# Altium PCB main_ADC_PCB.PcbDoc (part 7 of 8)
Units mm, origin at the board's own origin, x right, y up, seen from the top; angles counter-clockwise.
Board outline 150 x 100 mm, 4 copper layers (Top Layer, Layer 1, Layer 2, Bottom Layer), stack 1.62 mm thick; 535 components, 354 nets, 1725 pads, 1075 vias.
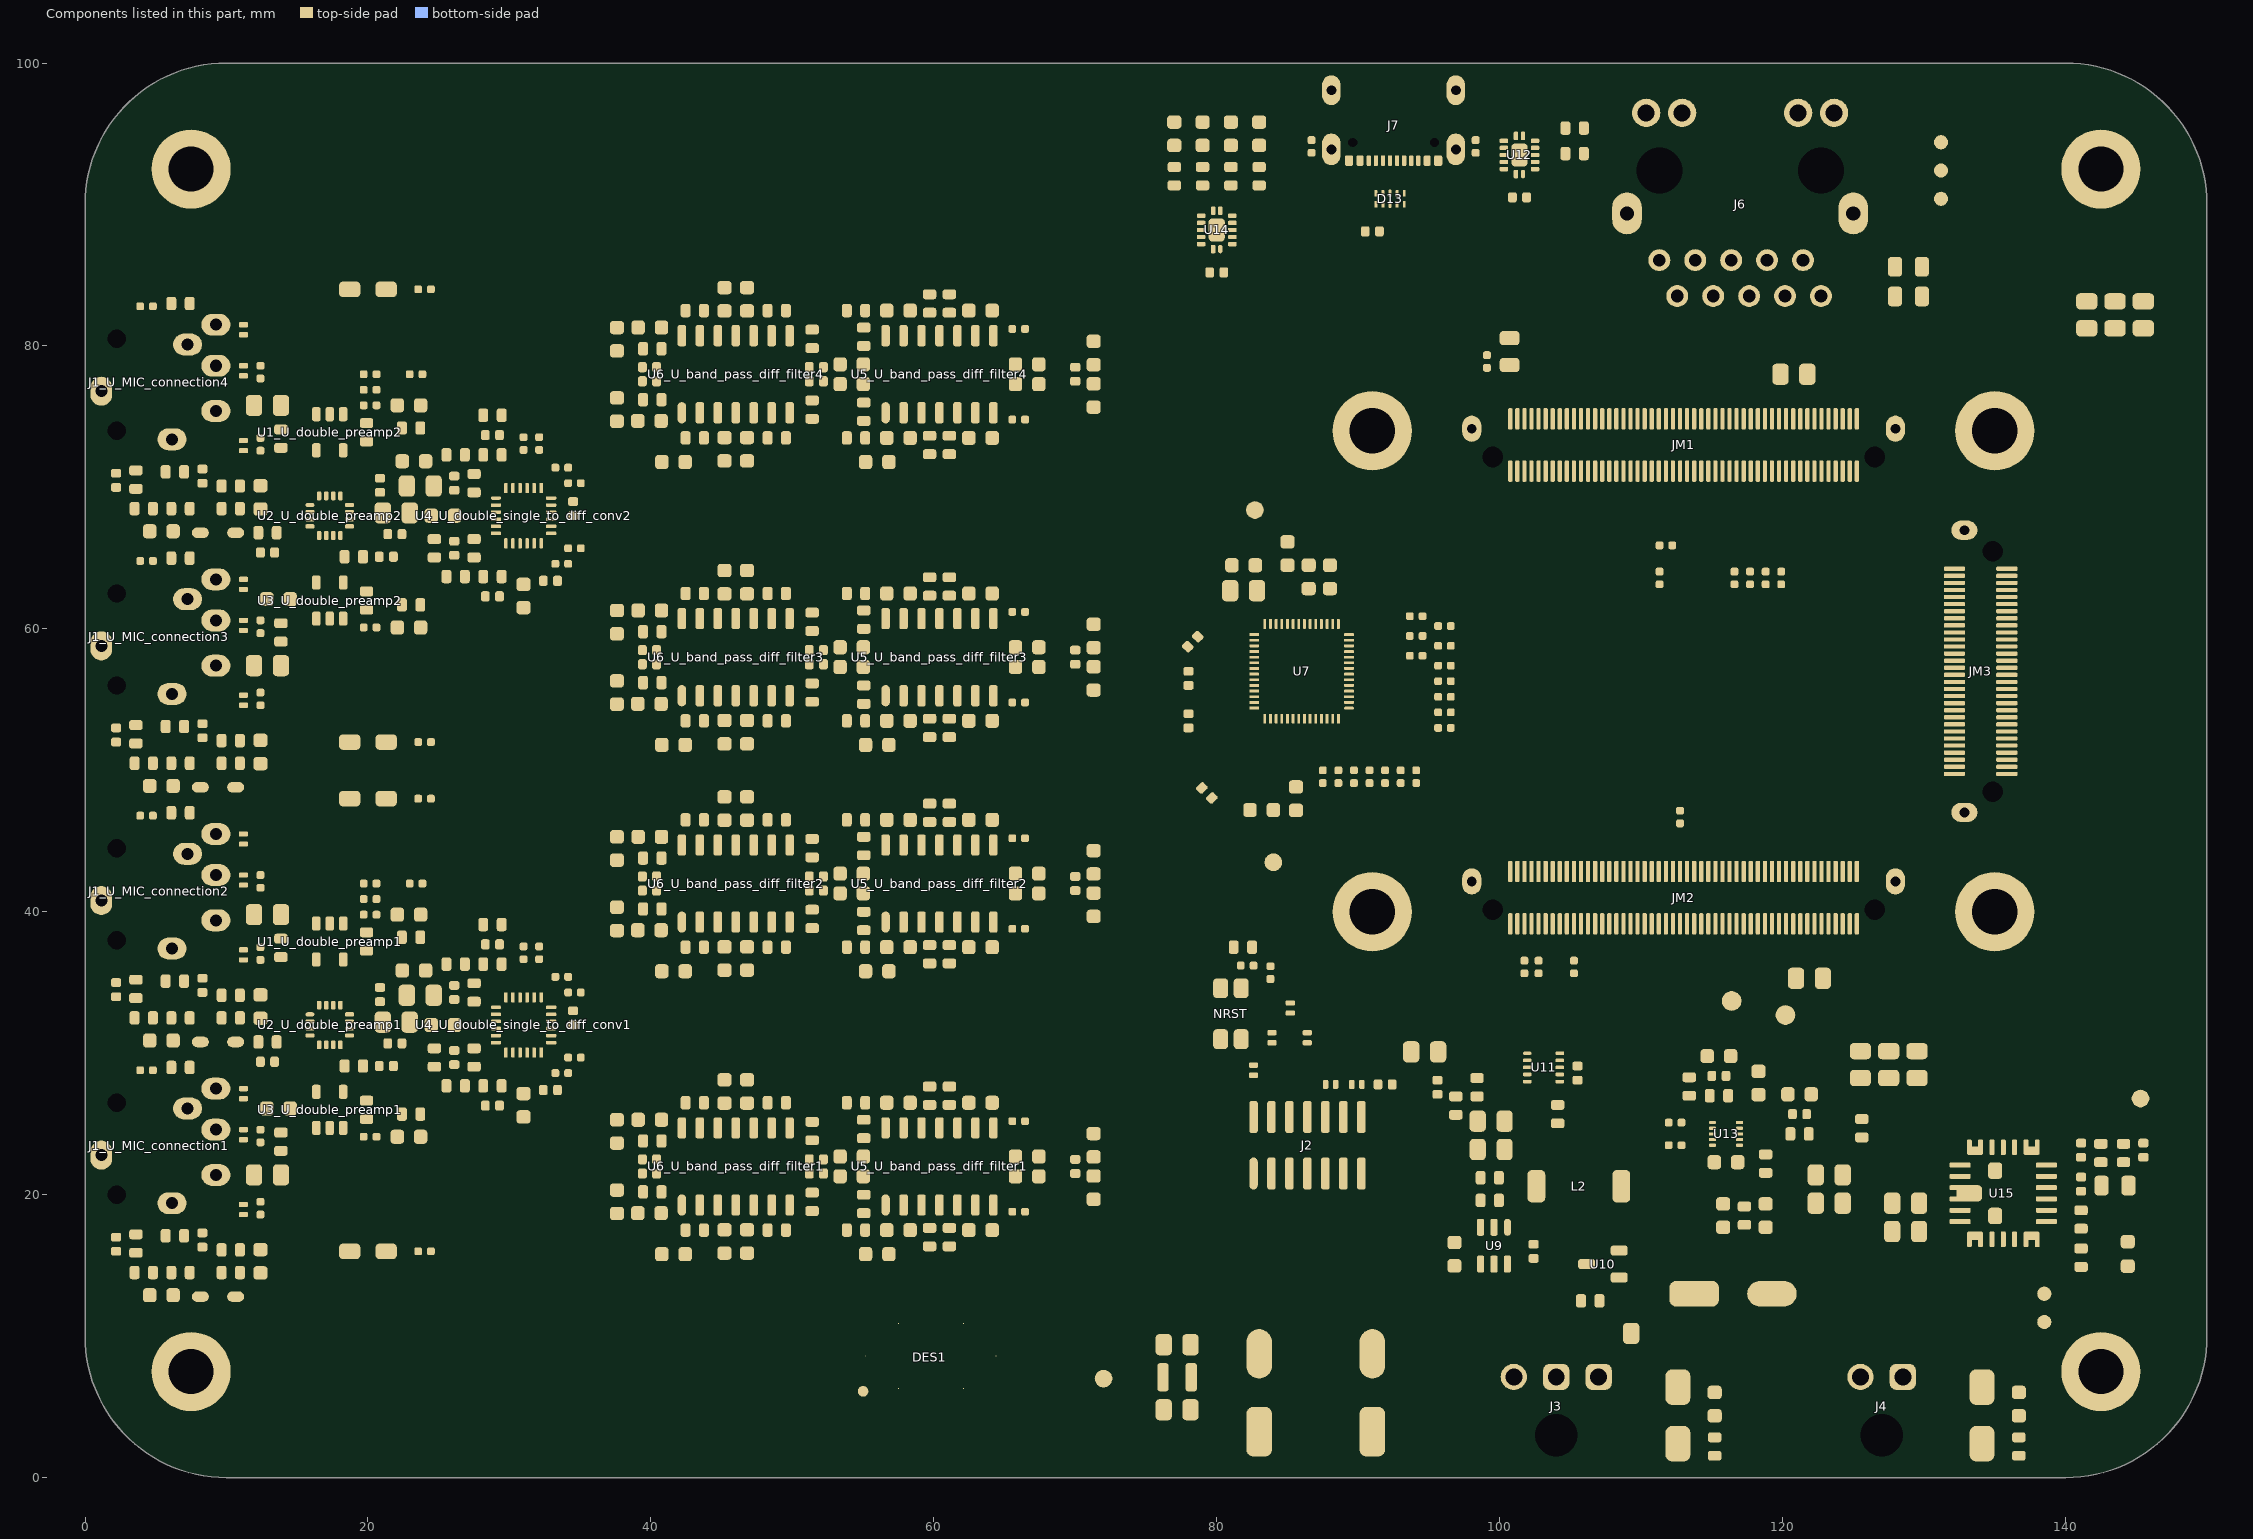
[diagram p9: the components of this part, seen from the top]

## Polygon pours and split planes (outlines as drawn) (continued)
USB_VBUS on Top Layer "USB_VBUS_L01_P008" (solid, pour order 8): 91.3,91.1 91.7,91.1 cw(c91.7,90.9) 91.9,90.9 91.9,87.8 cw(c91.7,87.8) 91.7,87.6 91.3,87.6 cw(c91.3,87.8) 91.1,87.8 91.1,90.9 cw(c91.3,90.9)
VOCM on Top Layer "VOCM_L01_P319" (solid, pour order 319): 27.3,60.5 27.3,60.3 ccw(c27.6,60.3) 27.6,60 29,60 ccw(c29,60.3) 29.3,60.3 29.3,60.5 ccw(c29,60.5) 29,60.8 27.6,60.8 ccw(c27.6,60.5)
VOCM on Top Layer "VOCM_L01_P391" (solid, pour order 391): 34.4,68.6 34.4,69.4 35,69.4 35.5,69.4 cw(c35.5,69.1) 35.8,69.1 35.8,66.9 cw(c35.5,66.9) 35.5,66.6 35.3,66.6 cw(c35.3,66.9) 35,66.9 35,68.2 ccw(c34.6,68.2) 34.6,68.6
VOCM on Top Layer "VOCM_L01_P131" (solid, pour order 131): 34,32.8 34,33.2 cw(c34.2,33.2) 34.2,33.4 35.6,33.4 cw(c35.6,33.2) 35.8,33.2 35.8,32.8 cw(c35.6,32.8) 35.6,32.6 34.2,32.6 cw(c34.2,32.8)
VOCM on Top Layer "VOCM_L01_P341" (solid, pour order 341): 34.4,32.6 34.4,33.4 35,33.4 35.5,33.4 cw(c35.5,33.1) 35.8,33.1 35.8,30.9 cw(c35.5,30.9) 35.5,30.6 35.3,30.6 cw(c35.3,30.9) 35,30.9 35,32.2 ccw(c34.6,32.2) 34.6,32.6
VOCM on Top Layer "VOCM_L01_P132" (solid, pour order 132): 34,68.8 34,69.2 cw(c34.2,69.2) 34.2,69.4 35.6,69.4 cw(c35.6,69.2) 35.8,69.2 35.8,68.8 cw(c35.6,68.8) 35.6,68.6 34.2,68.6 cw(c34.2,68.8)
VOCM on Top Layer "VOCM_L01_P392" (solid, pour order 392): 35.3,33.4 39.6,33.4 cw(c39.6,33.1) 39.9,33.1 39.9,30.9 cw(c39.6,30.9) 39.6,30.6 35.3,30.6 cw(c35.3,30.9) 35,30.9 35,33.1 cw(c35.3,33.1)
VOCM on Top Layer "VOCM_L01_P393" (solid, pour order 393): 35.3,69.4 39.6,69.4 cw(c39.6,69.1) 39.9,69.1 39.9,66.9 cw(c39.6,66.9) 39.6,66.6 35.3,66.6 cw(c35.3,66.9) 35,66.9 35,69.1 cw(c35.3,69.1)
5VA on Top Layer "5VA_L01_P286" (solid, pour order 286): 41.725,15.5 41.725,16.1 cw(c42.125,16.1) 42.125,16.5 43.525,16.5 cw(c43.525,16.1) 43.925,16.1 43.925,15.5 cw(c43.525,15.5) 43.525,15.1 42.125,15.1 cw(c42.125,15.5)
5VA on Top Layer "5VA_L01_P284" (solid, pour order 284): 56.125,15.5 56.125,16.1 cw(c56.525,16.1) 56.525,16.5 57.925,16.5 cw(c57.925,16.1) 58.325,16.1 58.325,15.5 cw(c57.925,15.5) 57.925,15.1 56.525,15.1 cw(c56.525,15.5)
GND on Top Layer "GND_L01_P079" (solid, pour order 79): 49.9,22.9 51.3,22.9 cw(c51.3,22.688) 51.512,22.688 51.512,21.312 cw(c51.3,21.312) 51.3,21.1 49.9,21.1 cw(c49.9,21.4) 49.6,21.4 49.6,22.6 cw(c49.9,22.6)
GND on Top Layer "GND_L01_P069" (solid, pour order 69): 40.089,22.689 40.089,21.311 ccw(c40.3,21.311) 40.3,21.1 41.4,21.1 ccw(c41.4,21.3) 41.6,21.3 41.6,22.7 ccw(c41.4,22.7) 41.4,22.9 40.3,22.9 ccw(c40.3,22.689)
VOCM on Top Layer "VOCM_L01_P049" (solid, pour order 49): 38,22 38,21.4 ccw(c38.3,21.4) 38.3,21.1 38.4,21.1 cw(c38.4,20.8) 38.7,20.8 38.7,19.8 ccw(c39,19.8) 39,19.5 39.6,19.5 ccw(c39.6,19.8) 39.9,19.8 39.9,22
VOCM on Top Layer "VOCM_L01_P048" (solid, pour order 48): 38,22 38,22.6 cw(c38.3,22.6) 38.3,22.9 38.4,22.9 ccw(c38.4,23.2) 38.7,23.2 38.7,24.2 cw(c39,24.2) 39,24.5 39.6,24.5 cw(c39.6,24.2) 39.9,24.2 39.9,22
VOCM on Top Layer "VOCM_L01_P041" (solid, pour order 41): 66.8,22 66.8,20.8 cw(c66.5,20.8) 66.5,20.5 66.1,20.5 ccw(c66.1,20.2) 65.8,20.2 65.8,19.8 ccw(c66.1,19.8) 66.1,19.5 67.8,19.5 ccw(c67.8,19.8) 68.1,19.8 68.1,22
VOCM on Top Layer "VOCM_L01_P040" (solid, pour order 40): 66.8,22 66.8,23.2 ccw(c66.5,23.2) 66.5,23.5 66.1,23.5 cw(c66.1,23.8) 65.8,23.8 65.8,24.2 cw(c66.1,24.2) 66.1,24.5 67.8,24.5 cw(c67.8,24.2) 68.1,24.2 68.1,22
VOCM on Top Layer "VOCM_L01_P033" (solid, pour order 33): 51.2,18.3 53.6,18.3 ccw(c53.6,18.7) 54,18.7 54,22 51.8,22 51.8,21.1 ccw(c52,21.1) 52,20.9 cw(c52,20.8) 52.1,20.8 52.1,19.6 cw(c51.9,19.6) 51.9,19.4 51.1,19.4 ccw(c51.1,19.1) 50.8,19.1 50.8,18.7 ccw(c51.2,18.7)
VOCM on Top Layer "VOCM_L01_P032" (solid, pour order 32): 51.2,25.7 53.6,25.7 cw(c53.6,25.3) 54,25.3 54,22 51.8,22 51.8,22.9 cw(c52,22.9) 52,23.1 ccw(c52,23.2) 52.1,23.2 52.1,24.4 ccw(c51.9,24.4) 51.9,24.6 51.1,24.6 cw(c51.1,24.9) 50.8,24.9 50.8,25.3 cw(c51.2,25.3)
GND on Top Layer "GND_L01_P021" (solid, pour order 21): 60.6,22.2 60.2,22.2 cw(c60.2,22.5) 59.9,22.5 59.9,25.3 cw(c60.2,25.3) 60.2,25.6 60.6,25.6 cw(c60.6,25.3) 60.9,25.3 60.9,22.5 cw(c60.6,22.5)
5VA on Top Layer "5VA_L01_P020" (solid, pour order 20): 60.2,21.8 60.6,21.8 cw(c60.6,21.5) 60.9,21.5 60.9,18.7 cw(c60.6,18.7) 60.6,18.4 60.2,18.4 cw(c60.2,18.7) 59.9,18.7 59.9,21.5 cw(c60.2,21.5)
GND on Top Layer "GND_L01_P019" (solid, pour order 19): 46.2,22.2 45.8,22.2 cw(c45.8,22.5) 45.5,22.5 45.5,25.3 cw(c45.8,25.3) 45.8,25.6 46.2,25.6 cw(c46.2,25.3) 46.5,25.3 46.5,22.5 cw(c46.2,22.5)
5VA on Top Layer "5VA_L01_P018" (solid, pour order 18): 45.8,21.8 46.2,21.8 cw(c46.2,21.5) 46.5,21.5 46.5,18.7 cw(c46.2,18.7) 46.2,18.4 45.8,18.4 cw(c45.8,18.7) 45.5,18.7 45.5,21.5 cw(c45.8,21.5)
3.3VPWR on Top Layer "3.3VPWR_L01_P162" (solid, pour order 162): 22 vertices, not listed, extent 122,28.5 140,40.5
3.3VD on Top Layer "3.3VD_L01_P394" (solid, pour order 394): 32.9,55.5 34.5,55.5 cw(c34.5,55.1) 34.9,55.1 34.9,44.9 cw(c34.5,44.9) 34.5,44.5 32.9,44.5 cw(c32.9,44.9) 32.5,44.9 32.5,55.1 cw(c32.9,55.1)
5VA on Top Layer "5VA_L01_P318" (solid, pour order 318): 56.125,71.5 56.125,72.1 cw(c56.525,72.1) 56.525,72.5 57.925,72.5 cw(c57.925,72.1) 58.325,72.1 58.325,71.5 cw(c57.925,71.5) 57.925,71.1 56.525,71.1 cw(c56.525,71.5)
5VA on Top Layer "5VA_L01_P312" (solid, pour order 312): 41.725,71.5 41.725,72.1 cw(c42.125,72.1) 42.125,72.5 43.525,72.5 cw(c43.525,72.1) 43.925,72.1 43.925,71.5 cw(c43.525,71.5) 43.525,71.1 42.125,71.1 cw(c42.125,71.5)
5VA on Top Layer "5VA_L01_P311" (solid, pour order 311): 56.125,51.5 56.125,52.1 cw(c56.525,52.1) 56.525,52.5 57.925,52.5 cw(c57.925,52.1) 58.325,52.1 58.325,51.5 cw(c57.925,51.5) 57.925,51.1 56.525,51.1 cw(c56.525,51.5)
5VA on Top Layer "5VA_L01_P304" (solid, pour order 304): 41.725,51.5 41.725,52.1 cw(c42.125,52.1) 42.125,52.5 43.525,52.5 cw(c43.525,52.1) 43.925,52.1 43.925,51.5 cw(c43.525,51.5) 43.525,51.1 42.125,51.1 cw(c42.125,51.5)
5VA on Top Layer "5VA_L01_P290" (solid, pour order 290): 56.125,35.5 56.125,36.1 cw(c56.525,36.1) 56.525,36.5 57.925,36.5 cw(c57.925,36.1) 58.325,36.1 58.325,35.5 cw(c57.925,35.5) 57.925,35.1 56.525,35.1 cw(c56.525,35.5)
5VA on Top Layer "5VA_L01_P288" (solid, pour order 288): 41.5,35.5 41.5,36.1 cw(c41.9,36.1) 41.9,36.5 43.3,36.5 cw(c43.3,36.1) 43.7,36.1 43.7,35.5 cw(c43.3,35.5) 43.3,35.1 41.9,35.1 cw(c41.9,35.5)
VOCM on Top Layer "VOCM_L01_P282" (solid, pour order 282): 13.5,60.9 15,60.9 cw(c15,60.6) 15.3,60.6 15.3,60.2 cw(c15,60.2) 15,59.9 13.5,59.9 cw(c13.5,60.2) 13.2,60.2 13.2,60.6 cw(c13.5,60.6)
VOCM on Top Layer "VOCM_L01_P280" (solid, pour order 280): 13.5,24.9 15,24.9 cw(c15,24.6) 15.3,24.6 15.3,24.2 cw(c15,24.2) 15,23.9 13.5,23.9 cw(c13.5,24.2) 13.2,24.2 13.2,24.6 cw(c13.5,24.6)
VOCM on Top Layer "VOCM_L01_P115" (solid, pour order 115): 19.5,29.7 20.9,29.7 cw(c20.9,29.4) 21.2,29.4 21.2,27.9 cw(c20.9,27.9) 20.9,27.6 19.5,27.6 cw(c19.5,27.9) 19.2,27.9 19.2,29.4 cw(c19.5,29.4)
VOCM on Top Layer "VOCM_L01_P114" (solid, pour order 114): 19.5,65.7 20.9,65.7 cw(c20.9,65.4) 21.2,65.4 21.2,63.9 cw(c20.9,63.9) 20.9,63.6 19.5,63.6 cw(c19.5,63.9) 19.2,63.9 19.2,65.4 cw(c19.5,65.4)
3.3VD on Top Layer "3.3VD_L01_P278" (solid, pour order 278): 81.3,36.848 79.352,36.848 cw(c79.352,37.2) 79,37.2 79,37.8 cw(c79.348,37.8) 79.348,38.148 81.3,38.148 cw(c81.3,37.748) 81.7,37.748 81.7,37.248 cw(c81.3,37.248)
3.3VD on Top Layer "3.3VD_L01_P276" (solid, pour order 276): 124.3,41.9 125.8,41.9 ccw(c125.8,42.1) 126,42.1 126,46.2 ccw(c125.8,46.2) 125.8,46.4 124.3,46.4 ccw(c124.3,46.2) 124.1,46.2 124.1,42.1 ccw(c124.3,42.1)
NetJM2_9 on Top Layer "NETJM2_9_L01_P176" (solid, pour order 176): 122.8,40.916 123.2,40.916 cw(c123.2,40.716) 123.4,40.716 123.4,38.316 cw(c123.2,38.316) 123.2,38.116 122.8,38.116 cw(c122.8,38.316) 122.6,38.316 122.6,40.716 cw(c122.8,40.716)
3.3VD on Top Layer "3.3VD_L01_P166" (solid, pour order 166): 110.8,63 110.8,63.2 cw(c111.1,63.2) 111.1,63.5 123,63.5 cw(c123,63.2) 123.3,63.2 123.3,63 cw(c123,63) 123,62.7 111.1,62.7 cw(c111.1,63)
3.3VD on Top Layer "3.3VD_L01_P165" (solid, pour order 165): 123.4,75.5 123.4,72.5 cw(c123.1,72.5) 123.1,72.2 120.6,72.2 cw(c120.6,72.5) 120.3,72.5 120.3,73.5 cw(c120.6,73.5) 120.6,73.8 122.3,73.8 ccw(c122.3,74.1) 122.6,74.1 122.6,75.5 cw(c122.8,75.5) 122.8,75.7 123.2,75.7 cw(c123.2,75.5)
3.3VPWR on Top Layer "3.3VPWR_L01_P163" (solid, pour order 163): 46 vertices, not listed, extent 121,34.4 146.5,82
3.3VPWR on Top Layer "3.3VPWR_L01_P161" (solid, pour order 161): 25 vertices, not listed, extent 130.6,22.7 146.5,35.2
NetC87_1 on Top Layer "NETC87_1_L01_P160" (solid, pour order 160): 146.5,22.7 146.5,22.1 cw(c146.2,22.1) 146.2,21.8 138,21.8 cw(c138,22) 137.8,22 137.8,22.2 cw(c138,22.2) 138,22.4 140.1,22.4 ccw(c140.1,22.7) 140.4,22.7 cw(c140.7,22.7) 140.7,23 146.2,23 cw(c146.2,22.7)
12VIN on Top Layer "12VIN_L01_P155" (solid, pour order 155): 17 vertices, not listed, extent 105.7,5.2 116.2,11.4
5VA on Top Layer "5VA_L01_P153" (solid, pour order 153): 102.3,30.9 102.3,29.5 cw(c102.1,29.5) 102.1,29.3 101.4,29.3 ccw(c101.4,28.576) 100.888,29.088 100.8,29 99.712,27.912 cw(c99.2,28.424) 99.2,27.7 95.2,27.7 cw(c95.2,28) 94.9,28 94.9,30.9 cw(c95.2,30.9) 95.2,31.2 102,31.2 cw(c102,30.9)
GND on Top Layer "GND_L01_P009" (solid, pour order 9): 105.3,28.5 105.7,28.5 cw(c105.7,28.2) 106,28.2 106,27.3 cw(c105.7,27.3) 105.7,27 105.3,27 cw(c105.3,27.3) 105,27.3 105,28.2 cw(c105.3,28.2)
PRE_REG_OUT on Top Layer "PRE_REG_OUT_L01_P150" (solid, pour order 150): 20 vertices, not listed, extent 99.5,20.6 107.3,25.5
NetC57_2 on Top Layer "NETC57_2_L01_P149" (solid, pour order 149): 17 vertices, not listed, extent 100.2,14.3 107.3,19.7
NetR83_2 on Top Layer "NETR83_2_L01_P140" (solid, pour order 140): 105.5,15.3 105.5,14.9 ccw(c105.8,14.9) 105.8,14.6 106.3,14.6 cw(c106.3,14.3) 106.6,14.3 106.6,12.2 ccw(c106.9,12.2) 106.9,11.9 107.3,11.9 ccw(c107.3,12.2) 107.6,12.2 107.6,15.3 ccw(c107.3,15.3) 107.3,15.6 105.8,15.6 ccw(c105.8,15.3)
12V_IN on Top Layer "12V_IN_L01_P139" (solid, pour order 139): 33 vertices, not listed, extent 77.312,6 108.2,15.8
12V_MIC on Top Layer "12V_MIC_L01_P137" (solid, pour order 137): 71,6.1 71,7.9 cw(c71.3,7.9) 71.3,8.2 73.7,8.2 76.6,8.2 cw(c76.6,7.8) 77,7.8 77,4.1 cw(c76.7,4.1) 76.7,3.8 74,3.8 cw(c74,4.1) 73.7,4.1 73.7,5.5 ccw(c73.4,5.5) 73.4,5.8 71.3,5.8 cw(c71.3,6.1)
3.3VD on Top Layer "3.3VD_L01_P136" (solid, pour order 136): 100,80.25 100,80.85 cw(c100.4,80.85) 100.4,81.25 102.05,81.25 cw(c102.05,80.8) 102.5,80.8 102.5,80.3 cw(c102.05,80.3) 102.05,79.85 100.4,79.85 cw(c100.4,80.25)
3.3VD on Top Layer "3.3VD_L01_P134" (solid, pour order 134): 33.5,73.7 33.5,73.4 cw(c33.2,73.4) 33.2,73.1 30.8,73.1 cw(c30.8,73.4) 30.5,73.4 30.5,73.7 cw(c30.8,73.7) 30.8,74 33.2,74 cw(c33.2,73.7)
VOCM on Top Layer "VOCM_L01_P129" (solid, pour order 129): 32.2,27.9 32.6,27.9 cw(c32.6,27.7) 32.8,27.7 32.8,26.3 cw(c32.6,26.3) 32.6,26.1 32.2,26.1 cw(c32.2,26.3) 32,26.3 32,27.7 cw(c32.2,27.7)
VOCM on Top Layer "VOCM_L01_P127" (solid, pour order 127): 32.2,63.9 32.6,63.9 cw(c32.6,63.7) 32.8,63.7 32.8,62.3 cw(c32.6,62.3) 32.6,62.1 32.2,62.1 cw(c32.2,62.3) 32,62.3 32,63.7 cw(c32.2,63.7)
5VA on Top Layer "5VA_L01_P126" (solid, pour order 126): 18.1,73.2 18.4,73.2 cw(c18.4,72.9) 18.7,72.9 18.7,72.76 ccw(c18.96,72.76) 18.96,72.5 22.8,72.5 cw(c22.8,72.2) 23.1,72.2 23.1,71.5 cw(c22.8,71.5) 22.8,71.2 18.1,71.2 cw(c18.1,71.5) 17.8,71.5 17.8,72.9 cw(c18.1,72.9)
5VA on Top Layer "5VA_L01_P125" (solid, pour order 125): 18.1,37.2 18.4,37.2 cw(c18.4,36.9) 18.7,36.9 18.7,36.76 ccw(c18.96,36.76) 18.96,36.5 22.8,36.5 cw(c22.8,36.2) 23.1,36.2 23.1,35.5 cw(c22.8,35.5) 22.8,35.2 18.1,35.2 cw(c18.1,35.5) 17.8,35.5 17.8,36.9 cw(c18.1,36.9)
3.3VD on Top Layer "3.3VD_L01_P123" (solid, pour order 123): 20.6,69.3 23.2,69.3 ccw(c23.2,69.6) 23.5,69.6 23.5,70.6 ccw(c23.2,70.6) 23.2,70.9 21.7,70.9 ccw(c21.7,70.6) 21.4,70.6 21.4,70.3 cw(c21.1,70.3) 21.1,70 20.6,70 ccw(c20.6,69.8) 20.4,69.8 20.4,69.5 ccw(c20.6,69.5)
3.3VD on Top Layer "3.3VD_L01_P122" (solid, pour order 122): 20.6,33.3 23.2,33.3 ccw(c23.2,33.6) 23.5,33.6 23.5,34.6 ccw(c23.2,34.6) 23.2,34.9 21.7,34.9 ccw(c21.7,34.6) 21.4,34.6 21.4,34.3 cw(c21.1,34.3) 21.1,34 20.6,34 ccw(c20.6,33.8) 20.4,33.8 20.4,33.5 ccw(c20.6,33.5)
5VA on Top Layer "5VA_L01_P118" (solid, pour order 118): 14.1,61.4 14.9,61.4 ccw(c14.9,61.7) 15.2,61.7 15.2,62.3 cw(c15.5,62.3) 15.5,62.6 16.5,62.6 ccw(c16.5,62.9) 16.8,62.9 16.8,63.6 ccw(c16.5,63.6) 16.5,63.9 14.1,63.9 ccw(c14.1,63.6) 13.8,63.6 13.8,61.7 ccw(c14.1,61.7)
5VA on Top Layer "5VA_L01_P117" (solid, pour order 117): 14.1,25.4 14.9,25.4 ccw(c14.9,25.7) 15.2,25.7 15.2,26.3 cw(c15.5,26.3) 15.5,26.6 16.5,26.6 ccw(c16.5,26.9) 16.8,26.9 16.8,27.6 ccw(c16.5,27.6) 16.5,27.9 14.1,27.9 ccw(c14.1,27.6) 13.8,27.6 13.8,25.7 ccw(c14.1,25.7)
VOCM on Top Layer "VOCM_L01_P113" (solid, pour order 113): 11.9,31.4 12.5,31.4 cw(c12.5,31.1) 12.8,31.1 12.8,28.3 cw(c12.5,28.3) 12.5,28 11.9,28 cw(c11.9,28.3) 11.6,28.3 11.6,31.1 cw(c11.9,31.1)
VOCM on Top Layer "VOCM_L01_P106" (solid, pour order 106): 11.9,67.4 12.5,67.4 cw(c12.5,67.1) 12.8,67.1 12.8,64.3 cw(c12.5,64.3) 12.5,64 11.9,64 cw(c11.9,64.3) 11.6,64.3 11.6,67.1 cw(c11.9,67.1)
VOCM on Top Layer "VOCM_L01_P105" (solid, pour order 105): 22.5,61.048 21.3,61.048 cw(c21.3,61.448) 20.9,61.448 20.9,61.948 cw(c21.3,61.948) 21.3,62.348 22.5,62.348 cw(c22.5,61.948) 22.9,61.948 22.9,61.448 cw(c22.5,61.448)
VOCM on Top Layer "VOCM_L01_P104" (solid, pour order 104): 22.5,25.048 21.3,25.048 cw(c21.3,25.448) 20.9,25.448 20.9,25.948 cw(c21.3,25.948) 21.3,26.348 22.5,26.348 cw(c22.5,25.948) 22.9,25.948 22.9,25.448 cw(c22.5,25.448)
VOCM on Top Layer "VOCM_L01_P103" (solid, pour order 103): 29.35,39.752 30.55,39.752 cw(c30.55,39.352) 30.95,39.352 30.95,38.852 cw(c30.55,38.852) 30.55,38.452 29.35,38.452 cw(c29.35,38.852) 28.95,38.852 28.95,39.352 cw(c29.35,39.352)
VOCM on Top Layer "VOCM_L01_P102" (solid, pour order 102): 29.35,75.752 30.55,75.752 cw(c30.55,75.352) 30.95,75.352 30.95,74.852 cw(c30.55,74.852) 30.55,74.452 29.35,74.452 cw(c29.35,74.852) 28.95,74.852 28.95,75.352 cw(c29.35,75.352)
VOCM on Top Layer "VOCM_L01_P101" (solid, pour order 101): 22.5,73.548 21.3,73.548 cw(c21.3,73.948) 20.9,73.948 20.9,74.448 cw(c21.3,74.448) 21.3,74.848 22.5,74.848 cw(c22.5,74.448) 22.9,74.448 22.9,73.948 cw(c22.5,73.948)
VOCM on Top Layer "VOCM_L01_P100" (solid, pour order 100): 22.5,37.548 21.3,37.548 cw(c21.3,37.948) 20.9,37.948 20.9,38.448 cw(c21.3,38.448) 21.3,38.848 22.5,38.848 cw(c22.5,38.448) 22.9,38.448 22.9,37.948 cw(c22.5,37.948)
VOCM on Top Layer "VOCM_L01_P099" (solid, pour order 99): 14.5,36.9 14.5,35.7 cw(c14.1,35.7) 14.1,35.3 13.6,35.3 cw(c13.6,35.7) 13.2,35.7 13.2,36.9 cw(c13.6,36.9) 13.6,37.3 14.1,37.3 cw(c14.1,36.9)
VOCM on Top Layer "VOCM_L01_P098" (solid, pour order 98): 14.5,72.9 14.5,71.7 cw(c14.1,71.7) 14.1,71.3 13.6,71.3 cw(c13.6,71.7) 13.2,71.7 13.2,72.9 cw(c13.6,72.9) 13.6,73.3 14.1,73.3 cw(c14.1,72.9)
12V_MIC on Top Layer "12V_MIC_L01_P091" (solid, pour order 91): 17 vertices, not listed, extent 7.4,11.1 10.1,13.4
12V_MIC on Top Layer "12V_MIC_L01_P090" (solid, pour order 90): 17 vertices, not listed, extent 7.4,29.1 10.1,31.4
12V_MIC on Top Layer "12V_MIC_L01_P089" (solid, pour order 89): 17 vertices, not listed, extent 7.4,47.1 10.1,49.4
12V_MIC on Top Layer "12V_MIC_L01_P085" (solid, pour order 85): 2.3,29.3 3.9,29.3 cw(c3.9,29) 4.2,29 4.2,28.6 cw(c3.9,28.6) 3.9,28.3 2.3,28.3 cw(c2.3,28.6) 2,28.6 2,29 cw(c2.3,29)
12V_MIC on Top Layer "12V_MIC_L01_P084" (solid, pour order 84): 2.3,47.3 3.9,47.3 cw(c3.9,47) 4.2,47 4.2,46.6 cw(c3.9,46.6) 3.9,46.3 2.3,46.3 cw(c2.3,46.6) 2,46.6 2,47 cw(c2.3,47)
12V_MIC on Top Layer "12V_MIC_L01_P083" (solid, pour order 83): 2.3,65.3 3.9,65.3 cw(c3.9,65) 4.2,65 4.2,64.6 cw(c3.9,64.6) 3.9,64.3 2.3,64.3 cw(c2.3,64.6) 2,64.6 2,65 cw(c2.3,65)
12V_MIC on Top Layer "12V_MIC_L01_P082" (solid, pour order 82): 2.3,83.3 3.9,83.3 cw(c3.9,83) 4.2,83 4.2,82.6 cw(c3.9,82.6) 3.9,82.3 2.3,82.3 cw(c2.3,82.6) 2,82.6 2,83 cw(c2.3,83)
12V_MIC on Top Layer "12V_MIC_L01_P080" (solid, pour order 80): 17 vertices, not listed, extent 7.4,65.1 10.1,67.4
GND on Top Layer "GND_L01_P078" (solid, pour order 78): 49.9,42.9 51.3,42.9 cw(c51.3,42.688) 51.512,42.688 51.512,41.312 cw(c51.3,41.312) 51.3,41.1 49.9,41.1 cw(c49.9,41.4) 49.6,41.4 49.6,42.6 cw(c49.9,42.6)
GND on Top Layer "GND_L01_P071" (solid, pour order 71): 49.9,58.9 51.3,58.9 cw(c51.3,58.688) 51.512,58.688 51.512,57.312 cw(c51.3,57.312) 51.3,57.1 49.9,57.1 cw(c49.9,57.4) 49.6,57.4 49.6,58.6 cw(c49.9,58.6)
VOCM on Top Layer "VOCM_L01_P026" (solid, pour order 26): 51.2,61.7 53.6,61.7 cw(c53.6,61.3) 54,61.3 54,58 51.8,58 51.8,58.9 cw(c52,58.9) 52,59.1 ccw(c52,59.2) 52.1,59.2 52.1,60.4 ccw(c51.9,60.4) 51.9,60.6 51.1,60.6 cw(c51.1,60.9) 50.8,60.9 50.8,61.3 cw(c51.2,61.3)
GND on Top Layer "GND_L01_P070" (solid, pour order 70): 49.9,78.9 51.3,78.9 cw(c51.3,78.688) 51.512,78.688 51.512,77.312 cw(c51.3,77.312) 51.3,77.1 49.9,77.1 cw(c49.9,77.4) 49.6,77.4 49.6,78.6 cw(c49.9,78.6)
GND on Top Layer "GND_L01_P068" (solid, pour order 68): 40.089,42.689 40.089,41.311 ccw(c40.3,41.311) 40.3,41.1 41.4,41.1 ccw(c41.4,41.3) 41.6,41.3 41.6,42.7 ccw(c41.4,42.7) 41.4,42.9 40.3,42.9 ccw(c40.3,42.689)
GND on Top Layer "GND_L01_P067" (solid, pour order 67): 40.089,58.689 40.089,57.311 ccw(c40.3,57.311) 40.3,57.1 41.4,57.1 ccw(c41.4,57.3) 41.6,57.3 41.6,58.7 ccw(c41.4,58.7) 41.4,58.9 40.3,58.9 ccw(c40.3,58.689)
GND on Top Layer "GND_L01_P066" (solid, pour order 66): 40.089,78.689 40.089,77.311 ccw(c40.3,77.311) 40.3,77.1 41.4,77.1 ccw(c41.4,77.3) 41.6,77.3 41.6,78.7 ccw(c41.4,78.7) 41.4,78.9 40.3,78.9 ccw(c40.3,78.689)
VOCM on Top Layer "VOCM_L01_P047" (solid, pour order 47): 38,42 38,41.4 ccw(c38.3,41.4) 38.3,41.1 38.4,41.1 cw(c38.4,40.8) 38.7,40.8 38.7,39.8 ccw(c39,39.8) 39,39.5 39.6,39.5 ccw(c39.6,39.8) 39.9,39.8 39.9,42
VOCM on Top Layer "VOCM_L01_P046" (solid, pour order 46): 38,42 38,42.6 cw(c38.3,42.6) 38.3,42.9 38.4,42.9 ccw(c38.4,43.2) 38.7,43.2 38.7,44.2 cw(c39,44.2) 39,44.5 39.6,44.5 cw(c39.6,44.2) 39.9,44.2 39.9,42
VOCM on Top Layer "VOCM_L01_P045" (solid, pour order 45): 38,58 38,57.4 ccw(c38.3,57.4) 38.3,57.1 38.4,57.1 cw(c38.4,56.8) 38.7,56.8 38.7,55.8 ccw(c39,55.8) 39,55.5 39.6,55.5 ccw(c39.6,55.8) 39.9,55.8 39.9,58
VOCM on Top Layer "VOCM_L01_P044" (solid, pour order 44): 38,58 38,58.6 cw(c38.3,58.6) 38.3,58.9 38.4,58.9 ccw(c38.4,59.2) 38.7,59.2 38.7,60.2 cw(c39,60.2) 39,60.5 39.6,60.5 cw(c39.6,60.2) 39.9,60.2 39.9,58
VOCM on Top Layer "VOCM_L01_P043" (solid, pour order 43): 38,78 38,77.4 ccw(c38.3,77.4) 38.3,77.1 38.4,77.1 cw(c38.4,76.8) 38.7,76.8 38.7,75.8 ccw(c39,75.8) 39,75.5 39.6,75.5 ccw(c39.6,75.8) 39.9,75.8 39.9,78
VOCM on Top Layer "VOCM_L01_P042" (solid, pour order 42): 38,78 38,78.6 cw(c38.3,78.6) 38.3,78.9 38.4,78.9 ccw(c38.4,79.2) 38.7,79.2 38.7,80.2 cw(c39,80.2) 39,80.5 39.6,80.5 cw(c39.6,80.2) 39.9,80.2 39.9,78
VOCM on Top Layer "VOCM_L01_P039" (solid, pour order 39): 66.8,42 66.8,40.8 cw(c66.5,40.8) 66.5,40.5 66.1,40.5 ccw(c66.1,40.2) 65.8,40.2 65.8,39.8 ccw(c66.1,39.8) 66.1,39.5 67.8,39.5 ccw(c67.8,39.8) 68.1,39.8 68.1,42
VOCM on Top Layer "VOCM_L01_P038" (solid, pour order 38): 66.8,42 66.8,43.2 ccw(c66.5,43.2) 66.5,43.5 66.1,43.5 cw(c66.1,43.8) 65.8,43.8 65.8,44.2 cw(c66.1,44.2) 66.1,44.5 67.8,44.5 cw(c67.8,44.2) 68.1,44.2 68.1,42
VOCM on Top Layer "VOCM_L01_P037" (solid, pour order 37): 66.8,58 66.8,56.8 cw(c66.5,56.8) 66.5,56.5 66.1,56.5 ccw(c66.1,56.2) 65.8,56.2 65.8,55.8 ccw(c66.1,55.8) 66.1,55.5 67.8,55.5 ccw(c67.8,55.8) 68.1,55.8 68.1,58
VOCM on Top Layer "VOCM_L01_P036" (solid, pour order 36): 66.8,58 66.8,59.2 ccw(c66.5,59.2) 66.5,59.5 66.1,59.5 cw(c66.1,59.8) 65.8,59.8 65.8,60.2 cw(c66.1,60.2) 66.1,60.5 67.8,60.5 cw(c67.8,60.2) 68.1,60.2 68.1,58
VOCM on Top Layer "VOCM_L01_P035" (solid, pour order 35): 66.8,78 66.8,76.8 cw(c66.5,76.8) 66.5,76.5 66.1,76.5 ccw(c66.1,76.2) 65.8,76.2 65.8,75.8 ccw(c66.1,75.8) 66.1,75.5 67.8,75.5 ccw(c67.8,75.8) 68.1,75.8 68.1,78
VOCM on Top Layer "VOCM_L01_P034" (solid, pour order 34): 66.8,78 66.8,79.2 ccw(c66.5,79.2) 66.5,79.5 66.1,79.5 cw(c66.1,79.8) 65.8,79.8 65.8,80.2 cw(c66.1,80.2) 66.1,80.5 67.8,80.5 cw(c67.8,80.2) 68.1,80.2 68.1,78
VOCM on Top Layer "VOCM_L01_P031" (solid, pour order 31): 51.2,38.3 53.6,38.3 ccw(c53.6,38.7) 54,38.7 54,42 51.8,42 51.8,41.1 ccw(c52,41.1) 52,40.9 cw(c52,40.8) 52.1,40.8 52.1,39.6 cw(c51.9,39.6) 51.9,39.4 51.1,39.4 ccw(c51.1,39.1) 50.8,39.1 50.8,38.7 ccw(c51.2,38.7)
VOCM on Top Layer "VOCM_L01_P030" (solid, pour order 30): 51.2,45.7 53.6,45.7 cw(c53.6,45.3) 54,45.3 54,42 51.8,42 51.8,42.9 cw(c52,42.9) 52,43.1 ccw(c52,43.2) 52.1,43.2 52.1,44.4 ccw(c51.9,44.4) 51.9,44.6 51.1,44.6 cw(c51.1,44.9) 50.8,44.9 50.8,45.3 cw(c51.2,45.3)
VOCM on Top Layer "VOCM_L01_P029" (solid, pour order 29): 51.2,74.3 53.6,74.3 ccw(c53.6,74.7) 54,74.7 54,78 51.8,78 51.8,77.1 ccw(c52,77.1) 52,76.9 cw(c52,76.8) 52.1,76.8 52.1,75.6 cw(c51.9,75.6) 51.9,75.4 51.1,75.4 ccw(c51.1,75.1) 50.8,75.1 50.8,74.7 ccw(c51.2,74.7)
VOCM on Top Layer "VOCM_L01_P028" (solid, pour order 28): 51.2,81.7 53.6,81.7 cw(c53.6,81.3) 54,81.3 54,78 51.8,78 51.8,78.9 cw(c52,78.9) 52,79.1 ccw(c52,79.2) 52.1,79.2 52.1,80.4 ccw(c51.9,80.4) 51.9,80.6 51.1,80.6 cw(c51.1,80.9) 50.8,80.9 50.8,81.3 cw(c51.2,81.3)
VOCM on Top Layer "VOCM_L01_P027" (solid, pour order 27): 51.2,54.3 53.6,54.3 ccw(c53.6,54.7) 54,54.7 54,58 51.8,58 51.8,57.1 ccw(c52,57.1) 52,56.9 cw(c52,56.8) 52.1,56.8 52.1,55.6 cw(c51.9,55.6) 51.9,55.4 51.1,55.4 ccw(c51.1,55.1) 50.8,55.1 50.8,54.7 ccw(c51.2,54.7)
GND on Top Layer "GND_L01_P025" (solid, pour order 25): 60.6,78.2 60.2,78.2 cw(c60.2,78.5) 59.9,78.5 59.9,81.3 cw(c60.2,81.3) 60.2,81.6 60.6,81.6 cw(c60.6,81.3) 60.9,81.3 60.9,78.5 cw(c60.6,78.5)
5VA on Top Layer "5VA_L01_P024" (solid, pour order 24): 60.2,77.8 60.6,77.8 cw(c60.6,77.5) 60.9,77.5 60.9,74.7 cw(c60.6,74.7) 60.6,74.4 60.2,74.4 cw(c60.2,74.7) 59.9,74.7 59.9,77.5 cw(c60.2,77.5)
GND on Top Layer "GND_L01_P023" (solid, pour order 23): 46.2,78.2 45.8,78.2 cw(c45.8,78.5) 45.5,78.5 45.5,81.3 cw(c45.8,81.3) 45.8,81.6 46.2,81.6 cw(c46.2,81.3) 46.5,81.3 46.5,78.5 cw(c46.2,78.5)
5VA on Top Layer "5VA_L01_P022" (solid, pour order 22): 45.8,77.8 46.2,77.8 cw(c46.2,77.5) 46.5,77.5 46.5,74.7 cw(c46.2,74.7) 46.2,74.4 45.8,74.4 cw(c45.8,74.7) 45.5,74.7 45.5,77.5 cw(c45.8,77.5)
GND on Top Layer "GND_L01_P017" (solid, pour order 17): 60.6,42.2 60.2,42.2 cw(c60.2,42.5) 59.9,42.5 59.9,45.3 cw(c60.2,45.3) 60.2,45.6 60.6,45.6 cw(c60.6,45.3) 60.9,45.3 60.9,42.5 cw(c60.6,42.5)
5VA on Top Layer "5VA_L01_P016" (solid, pour order 16): 60.2,41.8 60.6,41.8 cw(c60.6,41.5) 60.9,41.5 60.9,38.7 cw(c60.6,38.7) 60.6,38.4 60.2,38.4 cw(c60.2,38.7) 59.9,38.7 59.9,41.5 cw(c60.2,41.5)
GND on Top Layer "GND_L01_P015" (solid, pour order 15): 46.2,42.2 45.8,42.2 cw(c45.8,42.5) 45.5,42.5 45.5,45.3 cw(c45.8,45.3) 45.8,45.6 46.2,45.6 cw(c46.2,45.3) 46.5,45.3 46.5,42.5 cw(c46.2,42.5)
5VA on Top Layer "5VA_L01_P014" (solid, pour order 14): 45.8,41.8 46.2,41.8 cw(c46.2,41.5) 46.5,41.5 46.5,38.7 cw(c46.2,38.7) 46.2,38.4 45.8,38.4 cw(c45.8,38.7) 45.5,38.7 45.5,41.5 cw(c45.8,41.5)
GND on Top Layer "GND_L01_P013" (solid, pour order 13): 60.6,58.2 60.2,58.2 cw(c60.2,58.5) 59.9,58.5 59.9,61.3 cw(c60.2,61.3) 60.2,61.6 60.6,61.6 cw(c60.6,61.3) 60.9,61.3 60.9,58.5 cw(c60.6,58.5)
5VA on Top Layer "5VA_L01_P012" (solid, pour order 12): 60.2,57.8 60.6,57.8 cw(c60.6,57.5) 60.9,57.5 60.9,54.7 cw(c60.6,54.7) 60.6,54.4 60.2,54.4 cw(c60.2,54.7) 59.9,54.7 59.9,57.5 cw(c60.2,57.5)
GND on Top Layer "GND_L01_P011" (solid, pour order 11): 46.2,58.2 45.8,58.2 cw(c45.8,58.5) 45.5,58.5 45.5,61.3 cw(c45.8,61.3) 45.8,61.6 46.2,61.6 cw(c46.2,61.3) 46.5,61.3 46.5,58.5 cw(c46.2,58.5)
5VA on Top Layer "5VA_L01_P010" (solid, pour order 10): 45.8,57.8 46.2,57.8 cw(c46.2,57.5) 46.5,57.5 46.5,54.7 cw(c46.2,54.7) 46.2,54.4 45.8,54.4 cw(c45.8,54.7) 45.5,54.7 45.5,57.5 cw(c45.8,57.5)
3.3VD on Layer 2 "3.3VD_L03_P222" (solid, pour order 222): 51 vertices, not listed, extent 73.5,10.5 146.5,91.5
5VA on Layer 2 "5VA_L03_P385" (solid, pour order 385): 29 vertices, not listed, extent 13.5,14.5 100,91.5
3.3VD on Layer 2 "3.3VD_L03_P221" (solid, pour order 221): 17 vertices, not listed, extent 22.5,10.5 97.6,46.2
1.8VD on Layer 2 "1.8VD_L03_P220" (solid, pour order 220): 25 vertices, not listed, extent 88.5,27.9 123.9,63.8
GND on Layer 2 "GND_L03_P179" (solid, pour order 179): 103.031,30.1 103.169,30.1 cw(c103.169,29.669) 103.6,29.669 103.6,28.331 cw(c103.169,28.331) 103.169,27.9 103.031,27.9 cw(c103.031,28.306) 102.625,28.306 102.625,29.694 cw(c103.031,29.694)
ETH_GND on Layer 2 "ETH_GND_L03_P219" (solid, pour order 219): 108,99.5 126,99.5 cw(c126,97) 128.5,97 128.5,83 cw(c126,83) 126,80.5 108,80.5 cw(c108,83) 105.5,83 105.5,97 cw(c108,97)
12VIN on Layer 2 "12VIN_L03_P224" (solid, pour order 224): 106.1,8.5 108.7,8.5 110.1,8.5 cw(c110.1,8) 110.6,8 110.6,6.3 cw(c110.1,6.3) 110.1,5.8 106.1,5.8 cw(c106.1,6.2) 105.7,6.2 105.7,8.1 cw(c106.1,8.1)
5VIN on Layer 2 "5VIN_L03_P227" (solid, pour order 227): 127.5,10.6 131.8,10.6 cw(c131.8,10.3) 132.1,10.3 132.1,6.3 cw(c131.6,6.3) 131.6,5.8 127.6,5.8 cw(c127.6,6.2) 127.2,6.2 127.2,10.3 cw(c127.5,10.3)
12V_MIC on Layer 2 "12V_MIC_L03_P229" (solid, pour order 229): 74,8.2 75.2,8.2 cw(c75.2,7.9) 75.5,7.9 75.5,4.1 cw(c75.2,4.1) 75.2,3.8 74,3.8 cw(c74,4.1) 73.7,4.1 73.7,7.9 cw(c74,7.9)
5VD on Layer 2 "5VD_L03_P072" (solid, pour order 72): 112.3,20 112.3,19 ccw(c112.6,19) 112.6,18.7 114.8,18.7 ccw(c114.8,19) 115.1,19 115.1,20 ccw(c114.8,20) 114.8,20.3 112.6,20.3 ccw(c112.6,20)
5VD on Layer 2 "5VD_L03_P133" (solid, pour order 133): 117.8,26.5 118.8,26.5 cw(c118.8,26.2) 119.1,26.2 119.1,24.8 cw(c118.8,24.8) 118.8,24.5 117.8,24.5 cw(c117.8,24.8) 117.5,24.8 117.5,26.2 cw(c117.8,26.2)
12V_MIC on Layer 2 "12V_MIC_L03_P231" (solid, pour order 231): 2.3,83.2 3.1,83.2 cw(c3.1,82.9) 3.4,82.9 3.4,82.7 cw(c3.1,82.7) 3.1,82.4 2.3,82.4 cw(c2.3,82.7) 2,82.7 2,82.9 cw(c2.3,82.9)
12V_MIC on Layer 2 "12V_MIC_L03_P232" (solid, pour order 232): 2.3,65.2 3.1,65.2 cw(c3.1,64.9) 3.4,64.9 3.4,64.7 cw(c3.1,64.7) 3.1,64.4 2.3,64.4 cw(c2.3,64.7) 2,64.7 2,64.9 cw(c2.3,64.9)
12V_MIC on Layer 2 "12V_MIC_L03_P234" (solid, pour order 234): 2.3,47.2 3.1,47.2 cw(c3.1,46.9) 3.4,46.9 3.4,46.7 cw(c3.1,46.7) 3.1,46.4 2.3,46.4 cw(c2.3,46.7) 2,46.7 2,46.9 cw(c2.3,46.9)
12V_MIC on Layer 2 "12V_MIC_L03_P253" (solid, pour order 253): 2.3,29.2 3.1,29.2 cw(c3.1,28.9) 3.4,28.9 3.4,28.7 cw(c3.1,28.7) 3.1,28.4 2.3,28.4 cw(c2.3,28.7) 2,28.7 2,28.9 cw(c2.3,28.9)
VOCM on Layer 2 "VOCM_L03_P257" (solid, pour order 257): 83.6,51.4 84.4,51.4 cw(c84.4,51.1) 84.7,51.1 84.7,49.1 cw(c84.4,49.1) 84.4,48.8 83.6,48.8 cw(c83.6,49.1) 83.3,49.1 83.3,51.1 cw(c83.6,51.1)
VOCM on Layer 2 "VOCM_L03_P258" (solid, pour order 258): 38.3,78.9 38.7,78.9 cw(c38.7,78.6) 39,78.6 39,77.4 cw(c38.7,77.4) 38.7,77.1 38.3,77.1 cw(c38.3,77.4) 38,77.4 38,78.6 cw(c38.3,78.6)
VOCM on Layer 2 "VOCM_L03_P259" (solid, pour order 259): 66,75.8 66,76.2 cw(c66.3,76.2) 66.3,76.5 67.5,76.5 cw(c67.5,76.2) 67.8,76.2 67.8,75.8 cw(c67.5,75.8) 67.5,75.5 66.3,75.5 cw(c66.3,75.8)
VOCM on Layer 2 "VOCM_L03_P263" (solid, pour order 263): 66,79.8 66,80.2 cw(c66.3,80.2) 66.3,80.5 67.5,80.5 cw(c67.5,80.2) 67.8,80.2 67.8,79.8 cw(c67.5,79.8) 67.5,79.5 66.3,79.5 cw(c66.3,79.8)
VOCM on Layer 2 "VOCM_L03_P303" (solid, pour order 303): 54,74.6 54,75.8 ccw(c53.7,75.8) 53.7,76.1 52.4,76.1 ccw(c52.4,75.8) 52.1,75.8 52.1,74.6 ccw(c52.4,74.6) 52.4,74.3 53.7,74.3 ccw(c53.7,74.6)
VOCM on Layer 2 "VOCM_L03_P305" (solid, pour order 305): 54,81.4 54,80.2 cw(c53.7,80.2) 53.7,79.9 52.4,79.9 cw(c52.4,80.2) 52.1,80.2 52.1,81.4 cw(c52.4,81.4) 52.4,81.7 53.7,81.7 cw(c53.7,81.4)
VOCM on Layer 2 "VOCM_L03_P306" (solid, pour order 306): 19.3,27.8 19.3,28.2 cw(c19.6,28.2) 19.6,28.5 20.8,28.5 cw(c20.8,28.2) 21.1,28.2 21.1,27.8 cw(c20.8,27.8) 20.8,27.5 19.6,27.5 cw(c19.6,27.8)
12V_MIC on Layer 2 "12V_MIC_L03_P316" (solid, pour order 316): 8.3,11.4 8.3,11.8 cw(c8.6,11.8) 8.6,12.1 9.8,12.1 cw(c9.8,11.8) 10.1,11.8 10.1,11.4 cw(c9.8,11.4) 9.8,11.1 8.6,11.1 cw(c8.6,11.4)
12V_MIC on Layer 2 "12V_MIC_L03_P317" (solid, pour order 317): 8.3,29.4 8.3,29.8 cw(c8.6,29.8) 8.6,30.1 9.8,30.1 cw(c9.8,29.8) 10.1,29.8 10.1,29.4 cw(c9.8,29.4) 9.8,29.1 8.6,29.1 cw(c8.6,29.4)
12V_MIC on Layer 2 "12V_MIC_L03_P326" (solid, pour order 326): 8.3,47.4 8.3,47.8 cw(c8.6,47.8) 8.6,48.1 9.8,48.1 cw(c9.8,47.8) 10.1,47.8 10.1,47.4 cw(c9.8,47.4) 9.8,47.1 8.6,47.1 cw(c8.6,47.4)
VOCM on Layer 2 "VOCM_L03_P327" (solid, pour order 327): 19.2,64.1 19.2,60.3 ccw(c19.6,60.3) 19.6,59.9 29.1,59.9 ccw(c29.1,60.3) 29.5,60.3 29.5,60.6 ccw(c29.1,60.6) 29.1,61 24.4,61 cw(c24.4,61.4) 24,61.4 24,67.3 23.1,67.3 23.1,66 21.6,64.5 21.5,64.5 19.6,64.5 ccw(c19.6,64.1)
VOCM on Layer 2 "VOCM_L03_P328" (solid, pour order 328): 35.3,69.4 35.5,69.4 cw(c35.5,69.1) 35.8,69.1 35.8,66.9 cw(c35.5,66.9) 35.5,66.6 35.3,66.6 cw(c35.3,66.9) 35,66.9 35,69.1 cw(c35.3,69.1)
VOCM on Layer 2 "VOCM_L03_P329" (solid, pour order 329): 39.4,69.4 39.6,69.4 cw(c39.6,69.1) 39.9,69.1 39.9,66.9 cw(c39.6,66.9) 39.6,66.6 39.4,66.6 cw(c39.4,66.9) 39.1,66.9 39.1,69.1 cw(c39.4,69.1)
VOCM on Layer 2 "VOCM_L03_P330" (solid, pour order 330): 35.3,33.4 35.5,33.4 cw(c35.5,33.1) 35.8,33.1 35.8,30.9 cw(c35.5,30.9) 35.5,30.6 35.3,30.6 cw(c35.3,30.9) 35,30.9 35,33.1 cw(c35.3,33.1)
VOCM on Layer 2 "VOCM_L03_P331" (solid, pour order 331): 39.4,33.4 39.6,33.4 cw(c39.6,33.1) 39.9,33.1 39.9,30.9 cw(c39.6,30.9) 39.6,30.6 39.4,30.6 cw(c39.4,30.9) 39.1,30.9 39.1,33.1 cw(c39.4,33.1)
VOCM on Layer 2 "VOCM_L03_P332" (solid, pour order 332): 38.3,58.9 38.7,58.9 cw(c38.7,58.6) 39,58.6 39,57.4 cw(c38.7,57.4) 38.7,57.1 38.3,57.1 cw(c38.3,57.4) 38,57.4 38,58.6 cw(c38.3,58.6)
VOCM on Layer 2 "VOCM_L03_P333" (solid, pour order 333): 66,55.8 66,56.2 cw(c66.3,56.2) 66.3,56.5 67.5,56.5 cw(c67.5,56.2) 67.8,56.2 67.8,55.8 cw(c67.5,55.8) 67.5,55.5 66.3,55.5 cw(c66.3,55.8)
VOCM on Layer 2 "VOCM_L03_P334" (solid, pour order 334): 66,59.8 66,60.2 cw(c66.3,60.2) 66.3,60.5 67.5,60.5 cw(c67.5,60.2) 67.8,60.2 67.8,59.8 cw(c67.5,59.8) 67.5,59.5 66.3,59.5 cw(c66.3,59.8)
VOCM on Layer 2 "VOCM_L03_P335" (solid, pour order 335): 54,54.6 54,55.8 ccw(c53.7,55.8) 53.7,56.1 52.4,56.1 ccw(c52.4,55.8) 52.1,55.8 52.1,54.6 ccw(c52.4,54.6) 52.4,54.3 53.7,54.3 ccw(c53.7,54.6)
VOCM on Layer 2 "VOCM_L03_P336" (solid, pour order 336): 54,61.4 54,60.2 cw(c53.7,60.2) 53.7,59.9 52.4,59.9 cw(c52.4,60.2) 52.1,60.2 52.1,61.4 cw(c52.4,61.4) 52.4,61.7 53.7,61.7 cw(c53.7,61.4)
VOCM on Layer 2 "VOCM_L03_P337" (solid, pour order 337): 38.3,42.9 38.7,42.9 cw(c38.7,42.6) 39,42.6 39,41.4 cw(c38.7,41.4) 38.7,41.1 38.3,41.1 cw(c38.3,41.4) 38,41.4 38,42.6 cw(c38.3,42.6)
VOCM on Layer 2 "VOCM_L03_P338" (solid, pour order 338): 66,39.8 66,40.2 cw(c66.3,40.2) 66.3,40.5 67.5,40.5 cw(c67.5,40.2) 67.8,40.2 67.8,39.8 cw(c67.5,39.8) 67.5,39.5 66.3,39.5 cw(c66.3,39.8)
VOCM on Layer 2 "VOCM_L03_P339" (solid, pour order 339): 66,43.8 66,44.2 cw(c66.3,44.2) 66.3,44.5 67.5,44.5 cw(c67.5,44.2) 67.8,44.2 67.8,43.8 cw(c67.5,43.8) 67.5,43.5 66.3,43.5 cw(c66.3,43.8)
VOCM on Layer 2 "VOCM_L03_P340" (solid, pour order 340): 54,38.6 54,39.8 ccw(c53.7,39.8) 53.7,40.1 52.4,40.1 ccw(c52.4,39.8) 52.1,39.8 52.1,38.6 ccw(c52.4,38.6) 52.4,38.3 53.7,38.3 ccw(c53.7,38.6)
VOCM on Layer 2 "VOCM_L03_P342" (solid, pour order 342): 54,45.4 54,44.2 cw(c53.7,44.2) 53.7,43.9 52.4,43.9 cw(c52.4,44.2) 52.1,44.2 52.1,45.4 cw(c52.4,45.4) 52.4,45.7 53.7,45.7 cw(c53.7,45.4)
VOCM on Layer 2 "VOCM_L03_P348" (solid, pour order 348): 38.3,22.9 38.7,22.9 cw(c38.7,22.6) 39,22.6 39,21.4 cw(c38.7,21.4) 38.7,21.1 38.3,21.1 cw(c38.3,21.4) 38,21.4 38,22.6 cw(c38.3,22.6)
VOCM on Layer 2 "VOCM_L03_P349" (solid, pour order 349): 66,19.8 66,20.2 cw(c66.3,20.2) 66.3,20.5 67.5,20.5 cw(c67.5,20.2) 67.8,20.2 67.8,19.8 cw(c67.5,19.8) 67.5,19.5 66.3,19.5 cw(c66.3,19.8)
VOCM on Layer 2 "VOCM_L03_P350" (solid, pour order 350): 66,23.8 66,24.2 cw(c66.3,24.2) 66.3,24.5 67.5,24.5 cw(c67.5,24.2) 67.8,24.2 67.8,23.8 cw(c67.5,23.8) 67.5,23.5 66.3,23.5 cw(c66.3,23.8)
VOCM on Layer 2 "VOCM_L03_P351" (solid, pour order 351): 54,18.6 54,19.8 ccw(c53.7,19.8) 53.7,20.1 52.4,20.1 ccw(c52.4,19.8) 52.1,19.8 52.1,18.6 ccw(c52.4,18.6) 52.4,18.3 53.7,18.3 ccw(c53.7,18.6)
VOCM on Layer 2 "VOCM_L03_P352" (solid, pour order 352): 54,25.4 54,24.2 cw(c53.7,24.2) 53.7,23.9 52.4,23.9 cw(c52.4,24.2) 52.1,24.2 52.1,25.4 cw(c52.4,25.4) 52.4,25.7 53.7,25.7 cw(c53.7,25.4)
3.3VD on Layer 2 "3.3VD_L03_P353" (solid, pour order 353): 32.5,55.1 32.5,54.2 ccw(c32.9,54.2) 32.9,53.8 34.5,53.8 ccw(c34.5,54.2) 34.9,54.2 34.9,55.1 ccw(c34.5,55.1) 34.5,55.5 32.9,55.5 ccw(c32.9,55.1)
3.3VD on Layer 2 "3.3VD_L03_P354" (solid, pour order 354): 21.4,34.6 21.4,33.6 ccw(c21.7,33.6) 21.7,33.3 22.2,33.3 cw(c22.2,33) 22.5,33 22.5,32.6 22.9,32.6 22.9,35.7 22.5,35.7 22.5,35.2 cw(c22.2,35.2) 22.2,34.9 21.7,34.9 ccw(c21.7,34.6)
GND on Layer 2 "GND_L03_P355" (solid, pour order 355): 60.8,23.3 60.8,22.5 cw(c60.5,22.5) 60.5,22.2 60.3,22.2 cw(c60.3,22.5) 60,22.5 60,23.3 cw(c60.3,23.3) 60.3,23.6 60.5,23.6 cw(c60.5,23.3)
GND on Layer 2 "GND_L03_P356" (solid, pour order 356): 46.4,23.3 46.4,22.5 cw(c46.1,22.5) 46.1,22.2 45.9,22.2 cw(c45.9,22.5) 45.6,22.5 45.6,23.3 cw(c45.9,23.3) 45.9,23.6 46.1,23.6 cw(c46.1,23.3)
GND on Layer 2 "GND_L03_P357" (solid, pour order 357): 46.4,43.3 46.4,42.5 cw(c46.1,42.5) 46.1,42.2 45.9,42.2 cw(c45.9,42.5) 45.6,42.5 45.6,43.3 cw(c45.9,43.3) 45.9,43.6 46.1,43.6 cw(c46.1,43.3)
GND on Layer 2 "GND_L03_P358" (solid, pour order 358): 60.8,43.3 60.8,42.5 cw(c60.5,42.5) 60.5,42.2 60.3,42.2 cw(c60.3,42.5) 60,42.5 60,43.3 cw(c60.3,43.3) 60.3,43.6 60.5,43.6 cw(c60.5,43.3)
GND on Layer 2 "GND_L03_P359" (solid, pour order 359): 46.4,59.3 46.4,58.5 cw(c46.1,58.5) 46.1,58.2 45.9,58.2 cw(c45.9,58.5) 45.6,58.5 45.6,59.3 cw(c45.9,59.3) 45.9,59.6 46.1,59.6 cw(c46.1,59.3)
GND on Layer 2 "GND_L03_P360" (solid, pour order 360): 60.8,59.3 60.8,58.5 cw(c60.5,58.5) 60.5,58.2 60.3,58.2 cw(c60.3,58.5) 60,58.5 60,59.3 cw(c60.3,59.3) 60.3,59.6 60.5,59.6 cw(c60.5,59.3)
GND on Layer 2 "GND_L03_P361" (solid, pour order 361): 46.4,79.3 46.4,78.5 cw(c46.1,78.5) 46.1,78.2 45.9,78.2 cw(c45.9,78.5) 45.6,78.5 45.6,79.3 cw(c45.9,79.3) 45.9,79.6 46.1,79.6 cw(c46.1,79.3)
GND on Layer 2 "GND_L03_P362" (solid, pour order 362): 60.8,79.3 60.8,78.5 cw(c60.5,78.5) 60.5,78.2 60.3,78.2 cw(c60.3,78.5) 60,78.5 60,79.3 cw(c60.3,79.3) 60.3,79.6 60.5,79.6 cw(c60.5,79.3)
GND on Layer 2 "GND_L03_P363" (solid, pour order 363): 50.4,42.6 50.4,41.4 cw(c50.1,41.4) 50.1,41.1 49.9,41.1 cw(c49.9,41.4) 49.6,41.4 49.6,42.6 cw(c49.9,42.6) 49.9,42.9 50.1,42.9 cw(c50.1,42.6)
GND on Layer 2 "GND_L03_P364" (solid, pour order 364): 41.6,42.6 41.6,41.4 cw(c41.3,41.4) 41.3,41.1 41.1,41.1 cw(c41.1,41.4) 40.8,41.4 40.8,42.6 cw(c41.1,42.6) 41.1,42.9 41.3,42.9 cw(c41.3,42.6)
GND on Layer 2 "GND_L03_P365" (solid, pour order 365): 41.6,22.6 41.6,21.4 cw(c41.3,21.4) 41.3,21.1 41.1,21.1 cw(c41.1,21.4) 40.8,21.4 40.8,22.6 cw(c41.1,22.6) 41.1,22.9 41.3,22.9 cw(c41.3,22.6)
GND on Layer 2 "GND_L03_P366" (solid, pour order 366): 50.4,22.6 50.4,21.4 cw(c50.1,21.4) 50.1,21.1 49.9,21.1 cw(c49.9,21.4) 49.6,21.4 49.6,22.6 cw(c49.9,22.6) 49.9,22.9 50.1,22.9 cw(c50.1,22.6)
GND on Layer 2 "GND_L03_P367" (solid, pour order 367): 50.4,58.6 50.4,57.4 cw(c50.1,57.4) 50.1,57.1 49.9,57.1 cw(c49.9,57.4) 49.6,57.4 49.6,58.6 cw(c49.9,58.6) 49.9,58.9 50.1,58.9 cw(c50.1,58.6)
GND on Layer 2 "GND_L03_P368" (solid, pour order 368): 41.6,58.6 41.6,57.4 cw(c41.3,57.4) 41.3,57.1 41.1,57.1 cw(c41.1,57.4) 40.8,57.4 40.8,58.6 cw(c41.1,58.6) 41.1,58.9 41.3,58.9 cw(c41.3,58.6)
GND on Layer 2 "GND_L03_P369" (solid, pour order 369): 50.4,78.6 50.4,77.4 cw(c50.1,77.4) 50.1,77.1 49.9,77.1 cw(c49.9,77.4) 49.6,77.4 49.6,78.6 cw(c49.9,78.6) 49.9,78.9 50.1,78.9 cw(c50.1,78.6)
GND on Layer 2 "GND_L03_P370" (solid, pour order 370): 41.6,78.6 41.6,77.4 cw(c41.3,77.4) 41.3,77.1 41.1,77.1 cw(c41.1,77.4) 40.8,77.4 40.8,78.6 cw(c41.1,78.6) 41.1,78.9 41.3,78.9 cw(c41.3,78.6)
GND on Layer 2 "GND_L03_P371" (solid, pour order 371): 16.4,32.6 16.4,31.4 ccw(c16.7,31.4) 16.7,31.1 17.9,31.1 ccw(c17.9,31.4) 18.2,31.4 18.2,32.6 ccw(c17.9,32.6) 17.9,32.9 16.7,32.9 ccw(c16.7,32.6)
GND on Layer 2 "GND_L03_P380" (solid, pour order 380): 16.4,68.6 16.4,67.4 ccw(c16.7,67.4) 16.7,67.1 17.9,67.1 ccw(c17.9,67.4) 18.2,67.4 18.2,68.6 ccw(c17.9,68.6) 17.9,68.9 16.7,68.9 ccw(c16.7,68.6)
GND on Layer 2 "GND_L03_P381" (solid, pour order 381): 29.6,69.1 29.6,66.9 ccw(c29.9,66.9) 29.9,66.6 32.1,66.6 ccw(c32.1,66.9) 32.4,66.9 32.4,69.1 ccw(c32.1,69.1) 32.1,69.4 29.9,69.4 ccw(c29.9,69.1)
GND on Layer 2 "GND_L03_P382" (solid, pour order 382): 29.6,33.1 29.6,30.9 ccw(c29.9,30.9) 29.9,30.6 32.1,30.6 ccw(c32.1,30.9) 32.4,30.9 32.4,33.1 ccw(c32.1,33.1) 32.1,33.4 29.9,33.4 ccw(c29.9,33.1)
GND on Layer 2 "GND_L03_P383" (solid, pour order 383): 84,58.7 84,55.3 ccw(c84.3,55.3) 84.3,55 87.7,55 ccw(c87.7,55.3) 88,55.3 88,58.7 ccw(c87.7,58.7) 87.7,59 84.3,59 ccw(c84.3,58.7)
GND on Layer 2 "GND_L03_P141" (solid, pour order 141): 128.9,16.2 128.9,15.1 ccw(c129.2,15.1) 129.2,14.8 132,14.8 ccw(c132,15.1) 132.3,15.1 132.3,16.2 ccw(c132,16.2) 132,16.5 129.2,16.5 ccw(c129.2,16.2)
GND on Layer 2 "GND_L03_P183" (solid, pour order 183): 115.931,25.2 116.069,25.2 cw(c116.069,24.769) 116.5,24.769 116.5,23.831 cw(c116.069,23.831) 116.069,23.4 115.931,23.4 cw(c115.931,23.831) 115.5,23.831 115.5,24.769 cw(c115.931,24.769)
12V_MIC on Layer 2 "12V_MIC_L03_P384" (solid, pour order 384): 8.3,65.4 8.3,65.8 cw(c8.6,65.8) 8.6,66.1 9.8,66.1 cw(c9.8,65.8) 10.1,65.8 10.1,65.4 cw(c9.8,65.4) 9.8,65.1 8.6,65.1 cw(c8.6,65.4)
GND on Layer 2 "GND_L03_P184" (solid, pour order 184): 139.2,23 139.2,23.9 cw(c139.5,23.9) 139.5,24.2 140.4,24.2 cw(c140.4,23.9) 140.7,23.9 140.7,23 cw(c140.4,23) 140.4,22.7 139.5,22.7 cw(c139.5,23)
5VA on Layer 1 "5VA_L02_P415" (solid, pour order 415): 84.8,63.9 85.2,63.9 cw(c85.2,63.6) 85.5,63.6 85.5,62.2 cw(c85.2,62.2) 85.2,61.9 84.8,61.9 cw(c84.8,62.2) 84.5,62.2 84.5,63.6 cw(c84.8,63.6)
GND on Layer 1 "GND_L02_P457" (solid, pour order 457): 17 vertices, not listed, extent 1,1 149,99
5VA on Layer 1 "NONET_L03_P-001" (solid, pour order 142): 85.5,49.2 85.7,49.2 ccw(c85.7,49.5) 86,49.5 86,51.5 ccw(c85.7,51.5) 85.7,51.8 85.5,51.8 ccw(c85.5,51.5) 85.2,51.5 85.2,49.5 ccw(c85.5,49.5)
1.8VD on Layer 1 "1.8VD_L02_P148" (solid, pour order 148): 122.4,46.3 123,46.3 cw(c123,46) 123.3,46 123.3,45.4 cw(c123,45.4) 123,45.1 122.4,45.1 cw(c122.4,45.4) 122.1,45.4 122.1,46 cw(c122.4,46)
VOCM on Layer 1 "VOCM_L02_P456" (solid, pour order 456): 27.3,60.5 27.3,60.3 ccw(c27.6,60.3) 27.6,60 29,60 ccw(c29,60.3) 29.3,60.3 29.3,60.5 ccw(c29,60.5) 29,60.8 27.6,60.8 ccw(c27.6,60.5)
5VA on Layer 1 "5VA_L02_P454" (solid, pour order 454): 43.125,71.4 43.125,72.2 cw(c43.425,72.2) 43.425,72.5 43.625,72.5 cw(c43.625,72.2) 43.925,72.2 43.925,71.4 cw(c43.625,71.4) 43.625,71.1 43.425,71.1 cw(c43.425,71.4)
5VA on Layer 1 "5VA_L02_P444" (solid, pour order 444): 57.525,71.4 57.525,72.2 cw(c57.825,72.2) 57.825,72.5 58.025,72.5 cw(c58.025,72.2) 58.325,72.2 58.325,71.4 cw(c58.025,71.4) 58.025,71.1 57.825,71.1 cw(c57.825,71.4)
5VA on Layer 1 "5VA_L02_P443" (solid, pour order 443): 60.8,77.5 60.8,76.7 cw(c60.5,76.7) 60.5,76.4 60.3,76.4 cw(c60.3,76.7) 60,76.7 60,77.5 cw(c60.3,77.5) 60.3,77.8 60.5,77.8 cw(c60.5,77.5)
5VA on Layer 1 "5VA_L02_P442" (solid, pour order 442): 46.4,77.5 46.4,76.7 cw(c46.1,76.7) 46.1,76.4 45.9,76.4 cw(c45.9,76.7) 45.6,76.7 45.6,77.5 cw(c45.9,77.5) 45.9,77.8 46.1,77.8 cw(c46.1,77.5)
5VA on Layer 1 "5VA_L02_P441" (solid, pour order 441): 43.125,51.4 43.125,52.2 cw(c43.425,52.2) 43.425,52.5 43.625,52.5 cw(c43.625,52.2) 43.925,52.2 43.925,51.4 cw(c43.625,51.4) 43.625,51.1 43.425,51.1 cw(c43.425,51.4)
5VA on Layer 1 "5VA_L02_P440" (solid, pour order 440): 57.525,51.4 57.525,52.2 cw(c57.825,52.2) 57.825,52.5 58.025,52.5 cw(c58.025,52.2) 58.325,52.2 58.325,51.4 cw(c58.025,51.4) 58.025,51.1 57.825,51.1 cw(c57.825,51.4)
5VA on Layer 1 "5VA_L02_P439" (solid, pour order 439): 60.8,57.5 60.8,56.7 cw(c60.5,56.7) 60.5,56.4 60.3,56.4 cw(c60.3,56.7) 60,56.7 60,57.5 cw(c60.3,57.5) 60.3,57.8 60.5,57.8 cw(c60.5,57.5)
5VA on Layer 1 "5VA_L02_P438" (solid, pour order 438): 46.4,57.5 46.4,56.7 cw(c46.1,56.7) 46.1,56.4 45.9,56.4 cw(c45.9,56.7) 45.6,56.7 45.6,57.5 cw(c45.9,57.5) 45.9,57.8 46.1,57.8 cw(c46.1,57.5)
5VA on Layer 1 "5VA_L02_P437" (solid, pour order 437): 43.125,35.4 43.125,36.2 cw(c43.425,36.2) 43.425,36.5 43.625,36.5 cw(c43.625,36.2) 43.925,36.2 43.925,35.4 cw(c43.625,35.4) 43.625,35.1 43.425,35.1 cw(c43.425,35.4)
5VA on Layer 1 "5VA_L02_P436" (solid, pour order 436): 57.525,35.4 57.525,36.2 cw(c57.825,36.2) 57.825,36.5 58.025,36.5 cw(c58.025,36.2) 58.325,36.2 58.325,35.4 cw(c58.025,35.4) 58.025,35.1 57.825,35.1 cw(c57.825,35.4)
5VA on Layer 1 "5VA_L02_P435" (solid, pour order 435): 60.8,41.5 60.8,40.7 cw(c60.5,40.7) 60.5,40.4 60.3,40.4 cw(c60.3,40.7) 60,40.7 60,41.5 cw(c60.3,41.5) 60.3,41.8 60.5,41.8 cw(c60.5,41.5)
5VA on Layer 1 "5VA_L02_P434" (solid, pour order 434): 46.4,41.5 46.4,40.7 cw(c46.1,40.7) 46.1,40.4 45.9,40.4 cw(c45.9,40.7) 45.6,40.7 45.6,41.5 cw(c45.9,41.5) 45.9,41.8 46.1,41.8 cw(c46.1,41.5)
5VA on Layer 1 "5VA_L02_P433" (solid, pour order 433): 43.125,15.4 43.125,16.2 cw(c43.425,16.2) 43.425,16.5 43.625,16.5 cw(c43.625,16.2) 43.925,16.2 43.925,15.4 cw(c43.625,15.4) 43.625,15.1 43.425,15.1 cw(c43.425,15.4)
5VA on Layer 1 "5VA_L02_P432" (solid, pour order 432): 57.525,15.4 57.525,16.2 cw(c57.825,16.2) 57.825,16.5 58.025,16.5 cw(c58.025,16.2) 58.325,16.2 58.325,15.4 cw(c58.025,15.4) 58.025,15.1 57.825,15.1 cw(c57.825,15.4)
5VA on Layer 1 "5VA_L02_P431" (solid, pour order 431): 60.8,21.5 60.8,20.7 cw(c60.5,20.7) 60.5,20.4 60.3,20.4 cw(c60.3,20.7) 60,20.7 60,21.5 cw(c60.3,21.5) 60.3,21.8 60.5,21.8 cw(c60.5,21.5)
5VA on Layer 1 "5VA_L02_P430" (solid, pour order 430): 46.4,21.5 46.4,20.7 cw(c46.1,20.7) 46.1,20.4 45.9,20.4 cw(c45.9,20.7) 45.6,20.7 45.6,21.5 cw(c45.9,21.5) 45.9,21.8 46.1,21.8 cw(c46.1,21.5)
3.3VD on Layer 1 "3.3VD_L02_P429" (solid, pour order 429): 21.7,70.9 21.8,70.9 cw(c21.8,70.6) 22.1,70.6 22.1,69.6 cw(c21.8,69.6) 21.8,69.3 21.7,69.3 cw(c21.7,69.6) 21.4,69.6 21.4,70.6 cw(c21.7,70.6)
5VA on Layer 1 "5VA_L02_P428" (solid, pour order 428): 13.6,63.1 13.6,63.5 cw(c13.9,63.5) 13.9,63.8 15.1,63.8 cw(c15.1,63.5) 15.4,63.5 15.4,63.1 cw(c15.1,63.1) 15.1,62.8 13.9,62.8 cw(c13.9,63.1)
VOCM on Layer 1 "VOCM_L02_P427" (solid, pour order 427): 19.3,63.8 19.3,64.2 cw(c19.6,64.2) 19.6,64.5 20.8,64.5 cw(c20.8,64.2) 21.1,64.2 21.1,63.8 cw(c20.8,63.8) 20.8,63.5 19.6,63.5 cw(c19.6,63.8)
5VA on Layer 1 "5VA_L02_P426" (solid, pour order 426): 31.1,63.8 30.9,63.8 cw(c30.9,64.1) 30.6,64.1 30.6,65 cw(c30.9,65) 30.9,65.3 31.1,65.3 cw(c31.1,65) 31.4,65 31.4,64.1 cw(c31.1,64.1)
5VA on Layer 1 "5VA_L02_P425" (solid, pour order 425): 26.8,67.9 26.8,68.1 cw(c27.1,68.1) 27.1,68.4 28,68.4 cw(c28,68.1) 28.3,68.1 28.3,67.9 cw(c28,67.9) 28,67.6 27.1,67.6 cw(c27.1,67.9)
5VA on Layer 1 "5VA_L02_P424" (solid, pour order 424): 19.2,66.5 19.2,66.7 cw(c19.5,66.7) 19.5,67 20.4,67 cw(c20.4,66.7) 20.7,66.7 20.7,66.5 cw(c20.4,66.5) 20.4,66.2 19.5,66.2 cw(c19.5,66.5)
5VA on Layer 1 "5VA_L02_P423" (solid, pour order 423): 20.2,71.7 20.2,71.9 cw(c20.5,71.9) 20.5,72.2 21.4,72.2 cw(c21.4,71.9) 21.7,71.9 21.7,71.7 cw(c21.4,71.7) 21.4,71.4 20.5,71.4 cw(c20.5,71.7)
3.3VD on Layer 1 "3.3VD_L02_P422" (solid, pour order 422): 21.7,34.9 21.8,34.9 cw(c21.8,34.6) 22.1,34.6 22.1,33.6 cw(c21.8,33.6) 21.8,33.3 21.7,33.3 cw(c21.7,33.6) 21.4,33.6 21.4,34.6 cw(c21.7,34.6)
5VA on Layer 1 "5VA_L02_P421" (solid, pour order 421): 20.2,35.7 20.2,35.9 cw(c20.5,35.9) 20.5,36.2 21.4,36.2 cw(c21.4,35.9) 21.7,35.9 21.7,35.7 cw(c21.4,35.7) 21.4,35.4 20.5,35.4 cw(c20.5,35.7)
5VA on Layer 1 "5VA_L02_P420" (solid, pour order 420): 13.6,27.1 13.6,27.5 cw(c13.9,27.5) 13.9,27.8 15.1,27.8 cw(c15.1,27.5) 15.4,27.5 15.4,27.1 cw(c15.1,27.1) 15.1,26.8 13.9,26.8 cw(c13.9,27.1)
5VA on Layer 1 "5VA_L02_P419" (solid, pour order 419): 31.1,27.8 30.9,27.8 cw(c30.9,28.1) 30.6,28.1 30.6,29 cw(c30.9,29) 30.9,29.3 31.1,29.3 cw(c31.1,29) 31.4,29 31.4,28.1 cw(c31.1,28.1)
5VA on Layer 1 "5VA_L02_P418" (solid, pour order 418): 26.8,31.9 26.8,32.1 cw(c27.1,32.1) 27.1,32.4 28,32.4 cw(c28,32.1) 28.3,32.1 28.3,31.9 cw(c28,31.9) 28,31.6 27.1,31.6 cw(c27.1,31.9)
5VA on Layer 1 "5VA_L02_P417" (solid, pour order 417): 19.2,30.5 19.2,30.7 cw(c19.5,30.7) 19.5,31 20.4,31 cw(c20.4,30.7) 20.7,30.7 20.7,30.5 cw(c20.4,30.5) 20.4,30.2 19.5,30.2 cw(c19.5,30.5)
3.3VD on Layer 1 "3.3VD_L02_P416" (solid, pour order 416): 79.1,37.4 79.1,37.6 cw(c79.4,37.6) 79.4,37.9 80.3,37.9 cw(c80.3,37.6) 80.6,37.6 80.6,37.4 cw(c80.3,37.4) 80.3,37.1 79.4,37.1 cw(c79.4,37.4)
1.8VD on Layer 1 "1.8VD_L02_P414" (solid, pour order 414): 89.3,63.5 89.9,63.5 cw(c89.9,63.2) 90.2,63.2 90.2,62.6 cw(c89.9,62.6) 89.9,62.3 89.3,62.3 cw(c89.3,62.6) 89,62.6 89,63.2 cw(c89.3,63.2)
3.3VD on Layer 1 "3.3VD_L02_P413" (solid, pour order 413): 99.8,90.1 99,90.1 cw(c99,90.4) 98.7,90.4 98.7,90.6 cw(c99,90.6) 99,90.9 99.8,90.9 cw(c99.8,90.6) 100.1,90.6 100.1,90.4 cw(c99.8,90.4)
3.3VD on Layer 1 "3.3VD_L02_P412" (solid, pour order 412): 101.9,81.3 102.1,81.3 cw(c102.1,81) 102.4,81 102.4,80.1 cw(c102.1,80.1) 102.1,79.8 101.9,79.8 cw(c101.9,80.1) 101.6,80.1 101.6,81 cw(c101.9,81)
3.3VD on Layer 1 "3.3VD_L02_P409" (solid, pour order 409): 123.3,63.2 123.3,63 cw(c123,63) 123,62.7 120.7,62.7 cw(c120.7,63) 120.4,63 120.4,63.2 cw(c120.7,63.2) 120.7,63.5 123,63.5 cw(c123,63.2)
3.3VD on Layer 1 "3.3VD_L02_P408" (solid, pour order 408): 124.3,46.4 125.8,46.4 cw(c125.8,46.2) 126,46.2 126,44 cw(c125.8,44) 125.8,43.8 124.3,43.8 cw(c124.3,44) 124.1,44 124.1,46.2 cw(c124.3,46.2)
5VD on Layer 1 "5VD_L02_P407" (solid, pour order 407): 112.3,20 112.3,19 ccw(c112.6,19) 112.6,18.7 114.8,18.7 ccw(c114.8,19) 115.1,19 115.1,20 ccw(c114.8,20) 114.8,20.3 112.6,20.3 ccw(c112.6,20)
5VD on Layer 1 "5VD_L02_P406" (solid, pour order 406): 117.8,26.5 118.8,26.5 cw(c118.8,26.2) 119.1,26.2 119.1,24.8 cw(c118.8,24.8) 118.8,24.5 117.8,24.5 cw(c117.8,24.8) 117.5,24.8 117.5,26.2 cw(c117.8,26.2)
5VA on Layer 1 "5VA_L02_P404" (solid, pour order 404): 97.2,31.2 99.5,31.2 cw(c99.5,30.9) 99.8,30.9 99.8,29.3 cw(c99.5,29.3) 99.5,29 97.2,29 cw(c97.2,29.3) 96.9,29.3 96.9,30.9 cw(c97.2,30.9)
3.3VD on Layer 1 "3.3VD_L02_P403" (solid, pour order 403): 114,31.9 114,30.9 ccw(c114.3,30.9) 114.3,30.6 116.9,30.6 ccw(c116.9,30.9) 117.2,30.9 117.2,31.9 ccw(c116.9,31.9) 116.9,32.2 114.3,32.2 ccw(c114.3,31.9)
1.8VD on Layer 1 "1.8VD_L02_P402" (solid, pour order 402): 119.6,30.8 120.8,30.8 cw(c120.8,30.5) 121.1,30.5 121.1,28.1 cw(c120.8,28.1) 120.8,27.8 119.6,27.8 cw(c119.6,28.1) 119.3,28.1 119.3,30.5 cw(c119.6,30.5)
12V_MIC on Layer 1 "12V_MIC_L02_P401" (solid, pour order 401): 8.3,65.4 8.3,65.8 cw(c8.6,65.8) 8.6,66.1 9.8,66.1 cw(c9.8,65.8) 10.1,65.8 10.1,65.4 cw(c9.8,65.4) 9.8,65.1 8.6,65.1 cw(c8.6,65.4)
12V_MIC on Layer 1 "12V_MIC_L02_P400" (solid, pour order 400): 8.3,47.4 8.3,47.8 cw(c8.6,47.8) 8.6,48.1 9.8,48.1 cw(c9.8,47.8) 10.1,47.8 10.1,47.4 cw(c9.8,47.4) 9.8,47.1 8.6,47.1 cw(c8.6,47.4)
12V_MIC on Layer 1 "12V_MIC_L02_P388" (solid, pour order 388): 8.3,29.4 8.3,29.8 cw(c8.6,29.8) 8.6,30.1 9.8,30.1 cw(c9.8,29.8) 10.1,29.8 10.1,29.4 cw(c9.8,29.4) 9.8,29.1 8.6,29.1 cw(c8.6,29.4)
12V_MIC on Layer 1 "12V_MIC_L02_P379" (solid, pour order 379): 8.3,11.4 8.3,11.8 cw(c8.6,11.8) 8.6,12.1 9.8,12.1 cw(c9.8,11.8) 10.1,11.8 10.1,11.4 cw(c9.8,11.4) 9.8,11.1 8.6,11.1 cw(c8.6,11.4)